# Altium PCB NB3000XN.PcbDoc (part 38 of 71)
Units mil, origin at the board's own origin, x right, y up, seen from the top; angles counter-clockwise.
Board outline 9527.56 x 6929.77 mil, 6 copper layers (Top Layer, GND+SHIELD, MidLayer1, MidLayer2, P2 - 3V3+5V0, Bottom Layer), stack 62.375 mil thick; 832 components, 1027 nets, 4655 pads, 4981 vias.
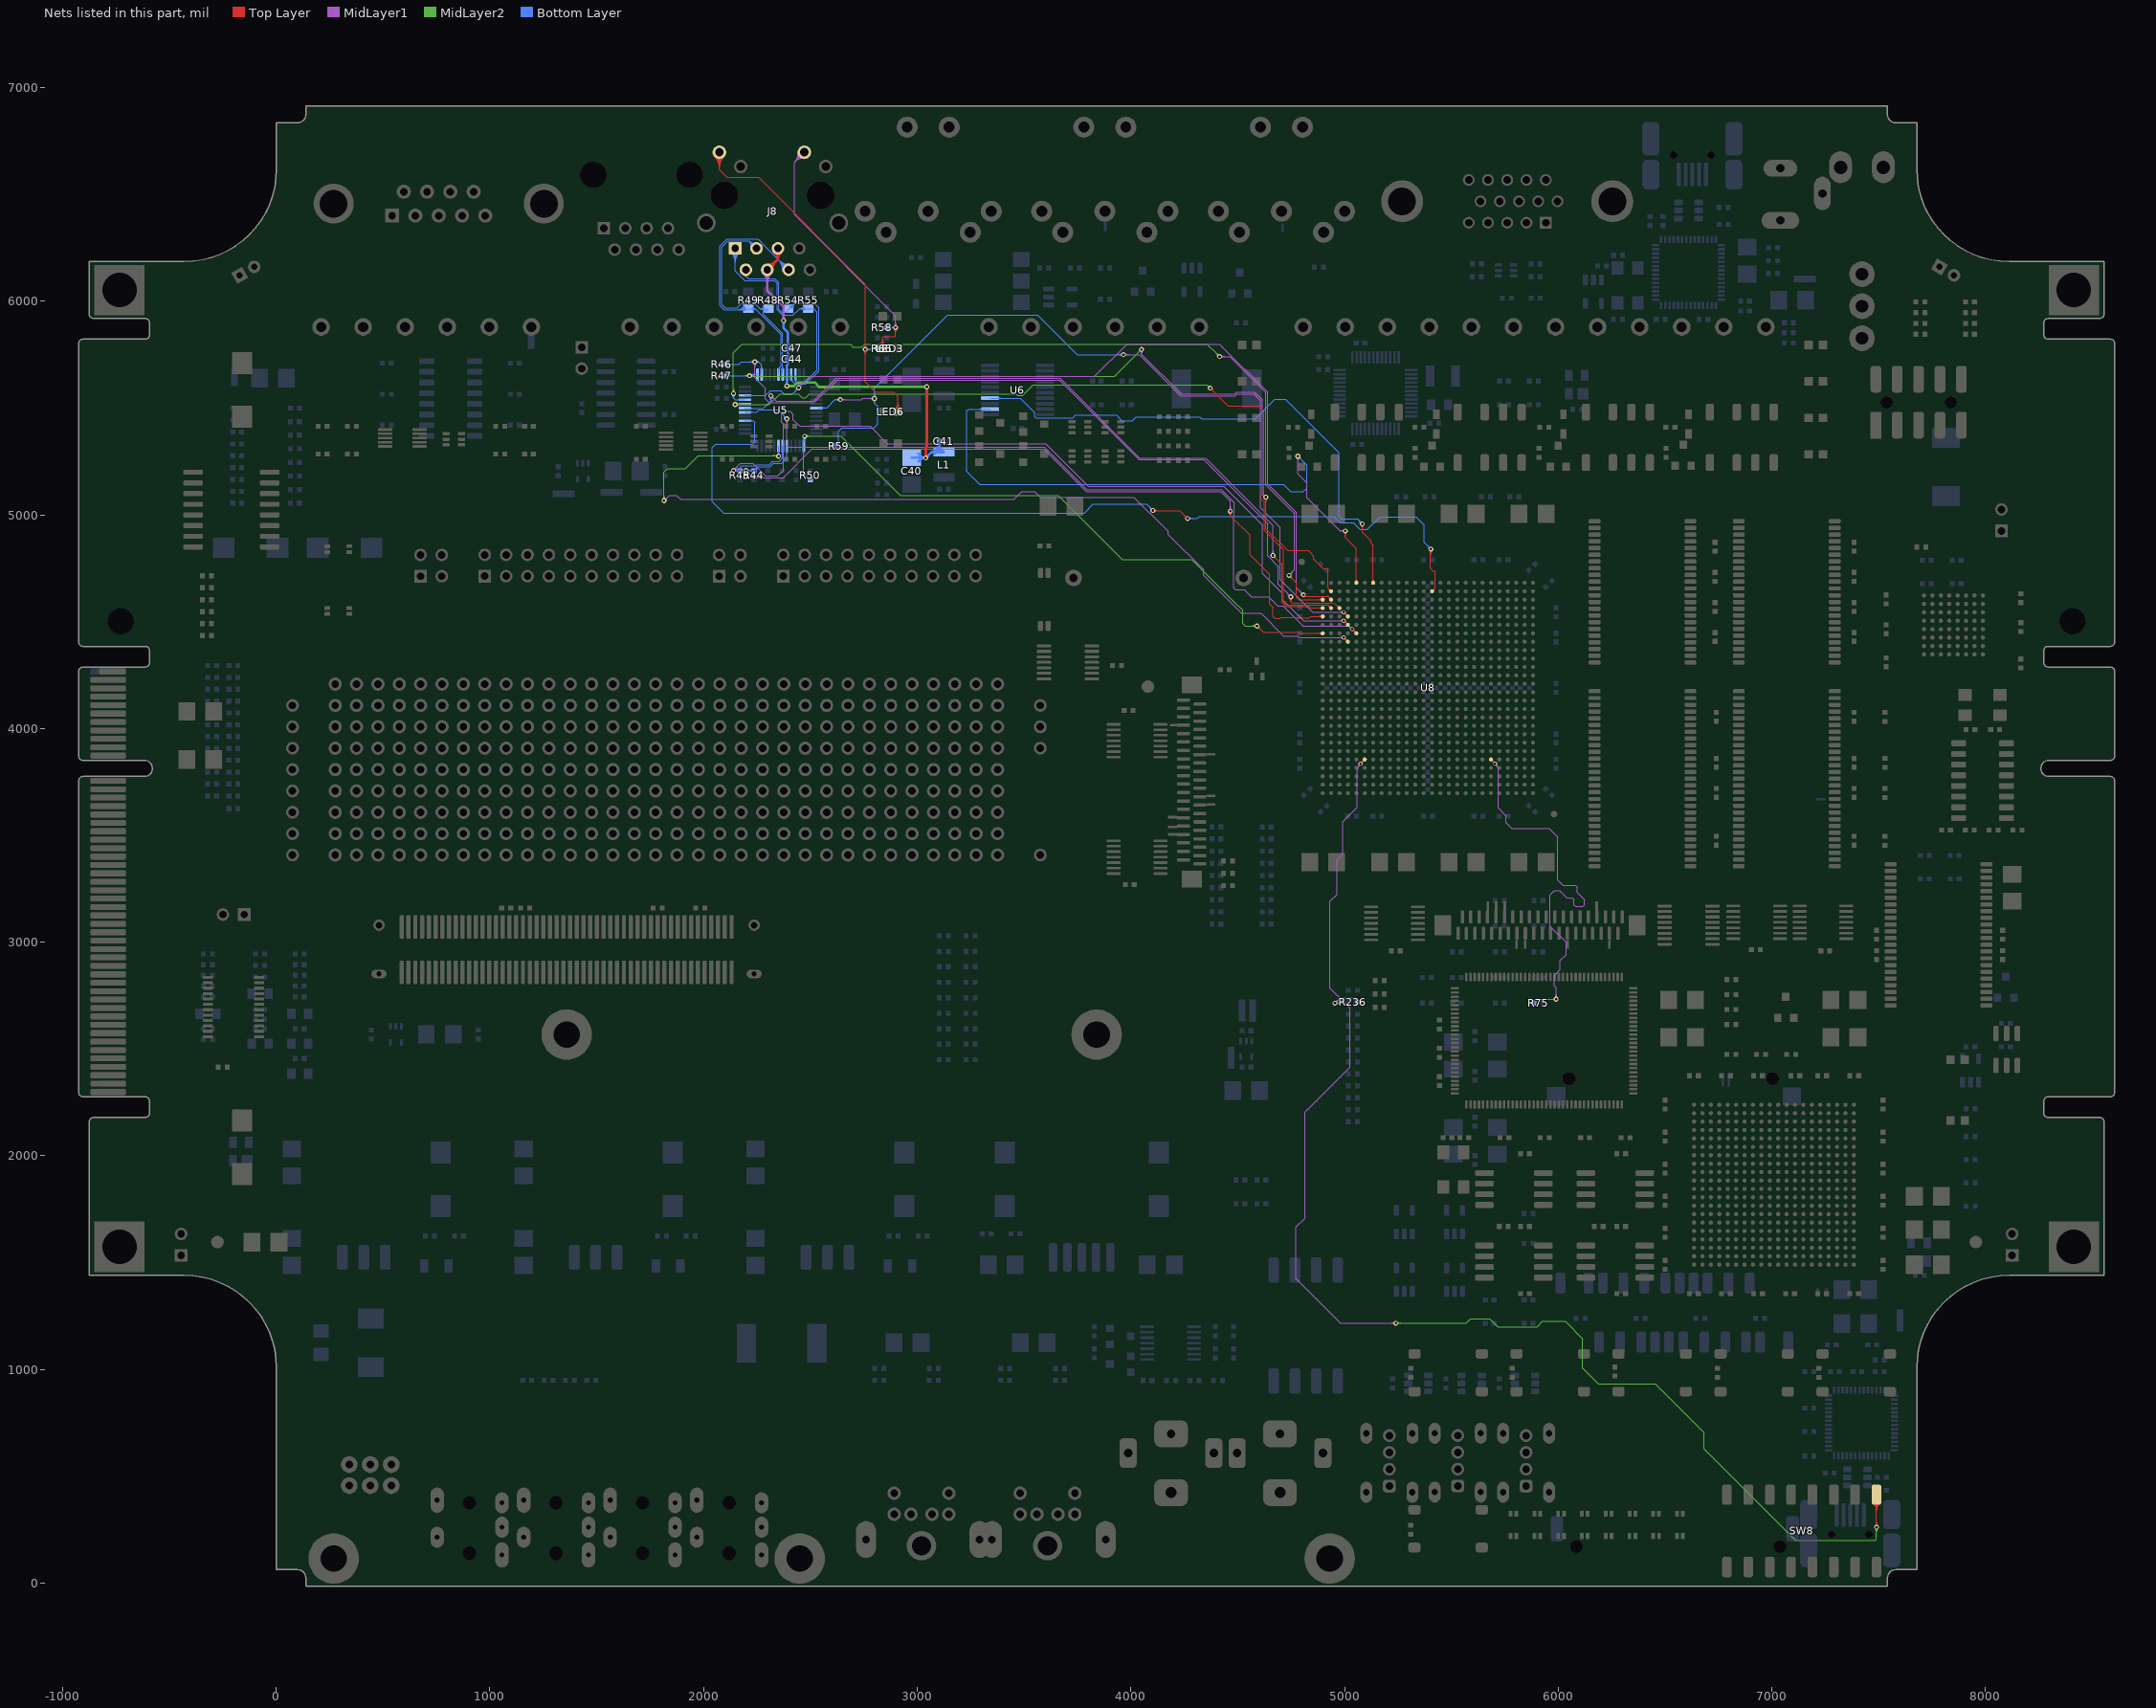
[diagram p42: the nets of this part, all layers, seen from the top]

## Via types
v1: diameter 23, hole 11.81, Top Layer to Bottom Layer, 3672 vias
v2: diameter 26, hole 11.81, Top Layer to Bottom Layer, 461 vias
v3: diameter 19, hole 11.81, Top Layer to Bottom Layer, tented both sides, 396 vias
v4: diameter 23.62, hole 11.81, Top Layer to Bottom Layer, 288 vias
v5: diameter 20, hole 11.81, Top Layer to Bottom Layer, 91 vias
v6: diameter 23, hole 11.81, Top Layer to Bottom Layer, tented both sides, 50 vias
v7: diameter 31, hole 11.81, Top Layer to Bottom Layer, 15 vias
v8: diameter 27.56, hole 11.81, Top Layer to Bottom Layer, tented both sides, 4 vias
v9: diameter 29, hole 11.81, Top Layer to Bottom Layer, 3 vias
v10: diameter 21, hole 11.81, Top Layer to Bottom Layer, 1 vias

## Nets (pads, with @x,y where several pads share a name; then routed paths per layer and width w, separated by ;. In a path a pad name is that pad's centre, name@x,y a point inside that pad or via, vN(x,y) a via of type N, cw(c..) or ccw(c..) an arc to the next point about the centre after c; other vN are vias at no path point) (continued)
DIPSW.D7: R236.1 SW8.9 U8.AB6 | length 7106.8
  Top Layer w4: v3(5075.04,3835.67) U8.AB6@5094.72,3855.35 ; U8.AB6@5087.22,3855.35 cw(c5069.12,3855.35) 5081.92,3842.55 cw(c5094.72,3829.75) U8.AB6@5094.72,3847.85 ; U8.AB6@5087.38,3855.35 cw(c5069.66,3855.35) 5082.19,3842.82 cw(c5094.72,3830.29) U8.AB6@5094.72,3848.01 ; SW8.9@7475.69,374.19 cw(c7441.13,339.63) 7490,339.63 cw(c7538.87,339.63) SW8.9@7504.31,374.19 ; SW8.9@7478.51,377.02 cw(c7450.78,349.29) 7490,349.29 cw(c7529.22,349.29) SW8.9@7501.49,377.02 ; SW8.9@7481.34,379.85 cw(c7460.44,358.94) 7490,358.94 cw(c7519.56,358.94) SW8.9@7498.66,379.85 ; v1@7483.47,268.43 ccw(c7467.71,284.18) 7490,284.18 ; v1@7486.3,265.6 ccw(c7477.37,274.53) 7490,274.53 ; 7490,275.44 ccw(c7503.93,275.44) v1@7494.08,265.6 ; 7490,285.1 ccw(c7513.58,285.1) v1@7496.91,268.43 ; SW8.9@7490,414.29 7490,273.23 7490.19,273.04 v1(7490.19,261.71) ; 5087.84,3848.47 cw(c5075.04,3861.28) 5075.04,3843.17 ccw(c5075.04,3861.28) 5087.84,3848.47 ; 5087.84,3848.47 ccw(c5100.65,3835.67) 5082.54,3835.67 cw(c5100.65,3835.67) 5087.84,3848.47
  MidLayer1 w4: v1(4955,2715) 5002.23,2715 ; v1@4958.89,2711.11 cw(c4968.28,2701.72) 4968.28,2715 cw(c4968.28,2728.28) v1@4958.89,2718.89 ; v1@4961.72,2708.28 cw(c4977.93,2692.06) 4977.93,2715 cw(c4977.93,2737.93) v1@4961.72,2721.72 ; 5064.62,3820.81 ccw(c5092.66,3803.16) 5059.53,3802.99 5059.53,3718.62 5059.53,3670 5059.53,3660 5059.53,3630.7 4992.19,3563.35 4992.19,3413.69 4964.86,3386.36 4964.86,3224.71 4931.86,3191.71 4931.86,2785.37 5002.23,2715 ; v3@5067.65,3834.37 cw(c5049.82,3831.22) 5064.65,3820.84 cw(c5079.49,3810.45) v3@5076.34,3828.28 ; v1@5233.47,1209.99 ccw(c5217.26,1193.77) 5217.26,1216.71 ccw(c5217.26,1239.64) v1@5233.47,1223.43 ; v1@5236.3,1212.82 ccw(c5226.91,1203.43) 5226.91,1216.71 ccw(c5226.91,1229.99) v1@5236.3,1220.6 ; v1(5240.19,1216.71) 4981.86,1216.71 4773.52,1425.04 4773.52,1666.71 4815.19,1708.37 4815.19,2204.71 5025.52,2415.04 5025.52,2691.71 5002.23,2715
  MidLayer2 w4: v1(5240.19,1216.71) 5570.14,1216.71 5590.72,1237.29 5680.32,1237.29 5717.39,1200.21 5901.32,1200.21 5926.31,1225.21 6032.42,1225.21 6113.36,1144.27 6113.36,1007.23 6187.7,932.88 6193.46,932.88 6193.96,933.37 6370,933.37 ; v1@5244.08,1212.82 cw(c5253.47,1203.43) 5253.47,1216.71 cw(c5253.47,1229.99) v1@5244.08,1220.6 ; v1@5246.91,1209.99 cw(c5263.13,1193.77) 5263.13,1216.71 cw(c5263.13,1239.64) v1@5246.91,1223.43 ; 6370,933.71 6454.98,933.71 6683.77,704.91 6683.77,627.79 7111.52,200.04 7485.04,200.04 7490.19,205.19 v1(7490.19,261.71) ; v1@7484,254.5 cw(c7472.46,241.04) 7490.19,241.04 cw(c7507.92,241.04) v1@7496.38,254.5 ; v1@7486.61,257.53 cw(c7479.93,249.74) 7490.19,249.74 cw(c7500.45,249.74) v1@7493.77,257.53
  Bottom Layer w4: v1(4955,2715) 4980,2740 5040.27,2740 R236.1@5061.18,2719.09 ; v1@4955,2720.5 ccw(c4955,2733.78) 4964.39,2724.39 ccw(c4973.78,2715) v1@4960.5,2715 ; v1@4955,2724.5 ccw(c4955,2747.43) 4971.22,2731.22 ccw(c4987.43,2715) v1@4964.5,2715 ; 5044.43,2735.84 ccw(c5061.18,2752.59) R236.1@5061.18,2728.9 ; 5045.62,2734.65 cw(c5030.55,2719.58) R236.1@5051.86,2719.58 ; R236.1@5051.26,2729.01 ccw(c5061.18,2738.93) R236.1@5061.18,2724.9 ; R236.1@5052.45,2727.82 cw(c5044.21,2719.58) R236.1@5055.86,2719.58
DONE: R75.2 U8.AB21 | length 2109.8
  Top Layer w4: U8.AB21@5685.28,3847.85 cw(c5685.28,3829.75) 5698.08,3842.55 cw(c5710.88,3855.35) U8.AB21@5692.78,3855.35 ; U8.AB21@5685.28,3848.01 cw(c5685.28,3830.29) 5697.81,3842.82 cw(c5710.34,3855.35) U8.AB21@5692.62,3855.35 ; U8.AB21@5685.28,3855.35 v3(5704.96,3835.67) ; 5692.16,3848.47 cw(c5679.35,3835.67) 5697.46,3835.67 ccw(c5679.35,3835.67) 5692.16,3848.47 ; 5692.16,3848.47 ccw(c5704.96,3861.28) 5704.96,3843.17 cw(c5704.96,3861.28) 5692.16,3848.47
  MidLayer1 w4: v3@5703.66,3828.28 cw(c5700.51,3810.45) 5715.35,3820.84 cw(c5730.18,3831.22) v3@5712.35,3834.37 ; 5715.38,3820.81 cw(c5687.34,3803.16) 5720.47,3802.99 5720.47,3718.62 5720.47,3670 5720.47,3660 5720.47,3628.06 5756.52,3592 5756.52,3559.98 5783.13,3533.37 5956.86,3533.37 5998.52,3491.71 5998.52,3291.29 6023.1,3266.71 6080.86,3266.71 6089.19,3258.37 6089.19,3233.37 6123.52,3199.04 6123.52,3175.04 6115.19,3166.71 6081.86,3166.71 6073.52,3175.04 6073.52,3200.04 6065.19,3208.37 6040.19,3208.37 6006.86,3241.71 5981.86,3241.71 5962.52,3222.37 5962.52,3074.73 6037.81,2999.44 6037.81,2942.31 6009.19,2913.69 6009.19,2871.37 5981.86,2844.04 5981.86,2795 5990.19,2786.67 v1(5990.19,2733.37) ; v1@5983.47,2740.09 ccw(c5967.26,2756.31) 5990.19,2756.31 ccw(c6013.13,2756.31) v1@5996.91,2740.09 ; v1@5986.3,2737.26 ccw(c5976.91,2746.65) 5990.19,2746.65 ccw(c6003.47,2746.65) v1@5994.08,2737.26
  Bottom Layer w4: R75.2@5885.82,2716.71 R75.2@5885.82,2715 5904.19,2733.37 v1(5990.19,2733.37) ; R75.2@5885.82,2720.81 ccw(c5885.82,2734.84) R75.2@5895.74,2724.92 ; R75.2@5885.82,2724.81 ccw(c5885.82,2748.5) 5902.57,2731.75 ; R75.2@5891.14,2715.49 cw(c5902.79,2715.49) R75.2@5894.55,2723.73 ; R75.2@5895.14,2715.49 cw(c5916.45,2715.49) 5901.38,2730.56
ETH#.ACT_A: J8.9 LED6.1 R66.2 | length 2525.6
  Top Layer w4: J8.9@2052.85,6676.36 cw(c2001.82,6625.33) 2073.98,6625.33 cw(c2146.14,6625.33) J8.9@2095.12,6676.36 ; J8.9@2055.68,6679.18 cw(c2011.48,6634.99) 2073.98,6634.99 cw(c2136.49,6634.99) J8.9@2092.29,6679.18 ; J8.9@2058.51,6682.01 cw(c2021.14,6644.64) 2073.98,6644.64 cw(c2126.83,6644.64) J8.9@2089.46,6682.01 ; J8.9@2061.33,6684.84 cw(c2030.79,6654.3) 2073.98,6654.3 cw(c2117.17,6654.3) J8.9@2086.63,6684.84 ; J8.9@2064.16,6687.67 cw(c2040.45,6663.96) 2073.98,6663.96 cw(c2107.52,6663.96) J8.9@2083.81,6687.67 ; J8.9@2073.98,6697.49 2073.98,6616.02 2110,6580 2256.9,6580 2756.86,6080.04 v1(2756.86,5775.04) 2756.86,5623.14 2805,5575 2890,5575 2909.01,5555.99 2909.01,5509.15 ; v1@2750.14,5768.32 cw(c2733.92,5752.11) 2756.86,5752.11 cw(c2779.79,5752.11) v1@2763.57,5768.32 ; v1@2750.14,5781.76 ccw(c2733.92,5797.98) 2756.86,5797.98 ccw(c2779.79,5797.98) v1@2763.57,5781.76 ; v1@2752.97,5771.15 cw(c2743.58,5761.76) 2756.86,5761.76 cw(c2770.14,5761.76) v1@2760.75,5771.15 ; v1@2752.97,5778.93 ccw(c2743.58,5788.32) 2756.86,5788.32 ccw(c2770.14,5788.32) v1@2760.75,5778.93 ; LED6.1@2896.51,5495.97 ccw(c2866.32,5526.16) 2909.01,5526.16 ccw(c2951.71,5526.16) LED6.1@2921.52,5495.97 ; LED6.1@2899.34,5493.15 ccw(c2875.97,5516.51) 2909.01,5516.51 ccw(c2942.05,5516.51) LED6.1@2918.69,5493.15 ; LED6.1@2902.16,5490.32 ccw(c2885.63,5506.85) 2909.01,5506.85 ccw(c2932.39,5506.85) LED6.1@2915.86,5490.32
  Bottom Layer w4: v1(2756.86,5775.04) 2779.86,5775.04 2783.82,5779 R66.2@2813.82,5779 ; v1@2760.75,5771.15 cw(c2770.14,5761.76) 2770.14,5775.04 cw(c2770.14,5788.32) v1@2760.75,5778.93 ; v1@2763.57,5768.32 cw(c2779.79,5752.11) 2779.79,5775.04 cw(c2779.79,5797.98) v1@2763.57,5781.76 ; R66.2@2807.23,5772.41 ccw(c2791.32,5756.5) 2791.32,5779 ccw(c2791.32,5801.5) R66.2@2807.23,5785.59 ; R66.2@2810.06,5775.24 ccw(c2800.98,5766.16) 2800.98,5779 ccw(c2800.98,5791.84) R66.2@2810.06,5782.76
ETH#.LINK_K: J8.11 LED3.2 R58.2 | length 1895
  Top Layer w4: LED3.2@2825.56,5792.51 ccw(c2795.37,5822.7) 2838.07,5822.7 ccw(c2880.77,5822.7) LED3.2@2850.58,5792.51 ; LED3.2@2828.39,5789.68 ccw(c2805.03,5813.04) 2838.07,5813.04 ccw(c2871.11,5813.04) LED3.2@2847.75,5789.68 ; LED3.2@2831.22,5786.85 ccw(c2814.69,5803.38) 2838.07,5803.38 ccw(c2861.45,5803.38) LED3.2@2844.92,5786.85 ; LED3.2@2838.07,5780 2838.07,5830.03 2843.04,5835 2896.57,5835 2898.86,5837.29 v1(2898.86,5876.71) ; v1@2892.14,5869.99 cw(c2875.92,5853.77) 2898.86,5853.77 cw(c2921.79,5853.77) v1@2905.57,5869.99 ; v1@2894.97,5872.82 cw(c2885.58,5863.43) 2898.86,5863.43 cw(c2912.14,5863.43) v1@2902.75,5872.82
  MidLayer1 w4: J8.11@2442.18,6695.71 cw(c2383.28,6692.2) 2425,6650.48 ; J8.11@2446.17,6695.95 cw(c2395.16,6692.91) 2431.29,6656.77 cw(c2467.43,6620.63) J8.11@2470.47,6671.65 ; J8.11@2450.16,6696.19 cw(c2407.03,6693.62) 2437.59,6663.06 cw(c2468.14,6632.51) J8.11@2470.71,6675.64 ; J8.11@2454.16,6696.43 cw(c2418.91,6694.32) 2443.88,6669.35 cw(c2468.85,6644.38) J8.11@2470.95,6679.63 ; J8.11@2470.24,6667.65 ccw(c2466.72,6608.76) 2425,6650.48 ; J8.11@2472.02,6697.49 2425,6650.48 ; v1@2892.14,5883.43 ccw(c2875.92,5899.64) 2898.86,5899.64 ccw(c2921.79,5899.64) v1@2905.57,5883.43 ; v1@2894.97,5880.6 ccw(c2885.58,5889.99) 2898.86,5889.99 ccw(c2912.14,5889.99) v1@2902.75,5880.6 ; v1(2898.86,5876.71) 2898.86,5931.14 2425,6405 2425,6650.48
  Bottom Layer w4: R58.2@2856.18,5877 2882.57,5877 2882.86,5876.71 ; R58.2@2859.94,5873.24 cw(c2869.02,5864.16) 2869.02,5877 cw(c2869.02,5889.84) R58.2@2859.94,5880.76 ; R58.2@2862.77,5870.41 cw(c2878.68,5854.5) 2878.68,5877 cw(c2878.68,5899.5) R58.2@2862.77,5883.59 ; v1@2890.52,5872.16 ccw(c2882.86,5867.98) 2882.86,5876.71 ; v1@2890.52,5881.26 cw(c2882.86,5885.43) 2882.86,5876.71 ; v1(2898.86,5876.71) 2882.86,5876.71
ETH#.RX_CT: C40.1 C41.2 C44.1 C47.2 J8.4 J8.5 L1.1 U5.32 | length 2667.9
  Top Layer w12: J8.4@2298,6147.49 2348,6197.49 ; J8.4@2298,6171.02 ccw(c2298,6227.82) 2338.16,6187.66 ccw(c2378.33,6147.49) J8.4@2321.53,6147.49 ; J8.5@2333,6229.36 cw(c2306.64,6197.49) 2348,6197.49 ; J8.5@2348,6247.49 2348,6197.49 ; J8.5@2363,6229.36 ccw(c2389.36,6197.49) 2348,6197.49 ; v1@3036.3,5270.6 ccw(c3026.91,5279.99) 3040.19,5279.99 ccw(c3053.47,5279.99) v1@3044.08,5270.6 ; v1(3040.19,5266.71) 3040.19,5315.19 3045,5320 v4(3045,5600) ; v4@3040.89,5595.89 cw(c3030.97,5585.97) 3045,5585.97 cw(c3059.03,5585.97) v4@3049.11,5595.89
  MidLayer1 w12: J8.4@2281.36,6130.85 cw(c2241.2,6090.69) 2298,6090.69 cw(c2354.8,6090.69) J8.4@2314.64,6130.85 ; J8.4@2298,6147.49 2298,6051.28 2375,5974.28 v4(2375,5910) ; v4@2370.89,5914.11 ccw(c2360.97,5924.03) 2375,5924.03 ccw(c2389.03,5924.03) v4@2379.11,5914.11
  MidLayer2 w12: v1(2390.19,5603.37) 2422.97,5603.37 2436.09,5616.5 2436.5,5616.5 2440,5620 2520,5620 2541.81,5598.19 2603.19,5598.19 2605,5600 v4(3045,5600) ; v1@2394.08,5599.49 cw(c2403.47,5590.1) 2403.47,5603.37 cw(c2403.47,5616.65) v1@2394.08,5607.26 ; v4@3040.89,5595.89 ccw(c3030.97,5585.97) 3030.97,5600 ccw(c3030.97,5614.03) v4@3040.89,5604.11
  Bottom Layer w12: v4@2370.89,5905.89 cw(c2360.97,5895.97) 2375,5895.97 cw(c2389.03,5895.97) v4@2379.11,5905.89 ; v4(2375,5910) 2375,5875 2394.33,5855.67 C47.2@2394.33,5780 C44.1@2394.33,5730 ; v1@2386.3,5607.26 ccw(c2376.42,5617.14) 2390.39,5617.14 ; v1(2390.19,5603.37) 2390.39,5603.58 U5.32@2390.39,5657.32 2390.39,5701.06 2394.33,5705 C44.1@2394.33,5730 ; C44.1@2390.22,5725.89 cw(c2380.3,5715.97) 2394.33,5715.97 cw(c2408.36,5715.97) C44.1@2398.44,5725.89 ; C44.1@2390.22,5734.11 ccw(c2380.3,5744.03) 2394.33,5744.03 ccw(c2408.36,5744.03) C44.1@2398.44,5734.11 ; C47.2@2390.22,5775.89 cw(c2380.3,5765.97) 2394.33,5765.97 cw(c2408.36,5765.97) C47.2@2398.44,5775.89 ; C47.2@2390.22,5784.11 ccw(c2380.3,5794.03) 2394.33,5794.03 ccw(c2408.36,5794.03) C47.2@2398.44,5784.11 ; 2390.39,5616.16 ccw(c2402.98,5616.16) v1@2394.08,5607.26 ; C40.1@2975,5267.99 v1@3038.91,5267.99 ; C40.1@3007.29,5250.4 cw(c3038.9,5230.8) v1@3038.9,5267.99 ; C40.1@3007.29,5285.58 ccw(c3038.9,5305.19) v1@3038.9,5267.99 ; 3023.81,5267.99 cw(c3023.81,5250.33) v1@3036.3,5262.82 ; v1@3040.19,5272.21 ccw(c3040.19,5285.49) 3049.58,5276.1 ccw(c3058.97,5266.71) v1@3045.69,5266.71 ; L1.1@3084.66,5285.67 ccw(c3067.54,5272.39) 3067.54,5294.06 ; L1.1@3084.66,5302.44 cw(c3067.54,5315.72) 3067.54,5294.06 ; L1.1@3086.6,5304.47 ccw(c3052.64,5344.33) C41.2@3105,5344.33 ; L1.1@3094.38,5295.34 ccw(c3074.78,5318.34) 3105,5318.34 ; C41.2@3100.22,5340.89 cw(c3088.69,5329.36) 3105,5329.36 ; C41.2@3104.33,5345 C41.2@3105,5344.33 ; 3105,5332.59 cw(c3116.74,5332.59) C41.2@3108.44,5340.89 ; v1@3038.91,5267.99 v1(3040.19,5266.71) 3067.54,5294.05 ; 3067.54,5294.06 L1.1@3125,5294.06 3105,5314.06 C41.2@3105,5344.33
ETH#.RX_N: J8.6 R49.1 U5.30 | length 1788
  Bottom Layer w4: 2148.79,5960 ccw(c2148.79,6021.92) R49.1@2192.57,5978.14 ; 2158.45,5960 ccw(c2158.45,6012.26) R49.1@2195.4,5975.31 ; 2168.11,5960 ccw(c2168.11,6002.6) R49.1@2198.23,5972.48 ; 2175.98,5960 cw(c2175.98,5936.53) R49.1@2192.57,5953.12 ; 2177.76,5960 ccw(c2177.76,5992.95) R49.1@2201.06,5969.65 ; R49.1@2185.63,5960 cw(c2185.63,5946.18) R49.1@2195.4,5955.95 ; R49.1@2206.12,5960 2097,5960 2077,5980 2077,6257 2111.02,6291.02 2254.72,6291.02 2283.53,6262.21 2283.53,6261.72 2397.76,6147.49 J8.6@2398,6147.49 ; R49.1@2211.75,5963.88 2243.11,5963.88 ; R49.1@2226.65,5958.57 cw(c2236.04,5952.93) 2236.04,5963.88 ; R49.1@2227.71,5970.5 ccw(c2237.31,5974.15) 2237.31,5963.88 ; R49.1@2230.07,5956.51 cw(c2243.11,5948.67) 2243.11,5963.88 ; R49.1@2231.45,5971.92 ccw(c2243.11,5976.36) 2243.11,5963.88 ; 2350.59,6194.66 ccw(c2398,6242.06) J8.6@2398,6175.02 ; U5.30@2351.02,5657.32 2351.02,5686.02 2362.71,5697.71 2362.71,5844.28 2243.11,5963.88 ; U5.30@2351.02,5680.85 cw(c2363.51,5680.85) 2354.68,5689.68 ; 2351.18,6194.07 cw(c2304.6,6147.49) J8.6@2370.47,6147.49 ; U5.30@2355.02,5680.85 cw(c2377.17,5680.85) 2361.51,5696.51 ; 2357.42,6187.83 ccw(c2398,6228.41) J8.6@2398,6171.02 ; 2358.01,6187.24 cw(c2318.26,6147.49) J8.6@2374.47,6147.49 ; 2364.25,6181 ccw(c2398,6214.75) J8.6@2398,6167.02 ; 2364.84,6180.41 cw(c2331.92,6147.49) J8.6@2378.47,6147.49 ; 2371.08,6174.17 ccw(c2398,6201.09) J8.6@2398,6163.02 ; 2371.67,6173.58 cw(c2345.57,6147.49) J8.6@2382.47,6147.49
ETH#.RX_P: J8.3 R48.1 U5.31 | length 1321.8
  Bottom Layer w4: J8.3@2221.12,6253.42 ccw(c2189.79,6260.33) 2212.47,6283.02 ; J8.3@2225.02,6252.56 ccw(c2198.25,6258.46) 2217.64,6277.85 ccw(c2237.03,6297.25) J8.3@2242.93,6270.47 ; J8.3@2228.93,6251.7 ccw(c2206.7,6256.6) 2222.8,6272.69 ccw(c2238.89,6288.79) J8.3@2243.79,6266.56 ; J8.3@2242.07,6274.37 cw(c2235.16,6305.7) 2212.47,6283.02 ; J8.3@2248,6247.49 2212.47,6283.02 ; R48.1@2283.75,5955.7 ccw(c2265,5942.96) 2265,5965.63 ; R48.1@2283.75,5975.56 cw(c2265,5988.3) 2265,5965.63 ; R48.1@2287.06,5957.94 ccw(c2272.55,5948.09) 2272.55,5965.63 ccw(c2272.55,5983.17) R48.1@2287.06,5973.32 ; U5.31@2367.88,5683.68 ccw(c2361.05,5690.51) 2370.71,5690.51 ccw(c2380.37,5690.51) U5.31@2373.54,5683.68 ; U5.31@2370.71,5657.32 2370.71,5847.6 2280,5938.31 2280,5950 2287.68,5950 R48.1@2303.31,5965.63 2265,5965.63 ; 2212.47,6283.02 2114.33,6283.02 2085,6253.69 2085,5985 2100,5970 2157.79,5970 2180,5992.21 2238.42,5992.21 2265,5965.63
ETH#.TX_N: J8.2 R54.2 U5.33 | length 1158.1
  Bottom Layer w4: J8.2@2198,6147.49 2198,6117 2210,6105 2335,6105 2353,6087 2353,5963.31 2366.31,5950 2385.94,5950 2399.13,5963.19 2427.25,5991.31 ; R54.2@2402.77,5975.25 ccw(c2404.64,5990.67) R54.2@2415.62,5979.68 ; R54.2@2403.25,5979.22 ccw(c2405.89,6001.05) 2421.44,5985.5 ; R54.2@2403.73,5983.19 ccw(c2407.14,6011.43) 2427.25,5991.31 ; U5.33@2410.08,5629.8 cw(c2410.08,5625.09) U5.33@2413.41,5628.42 ; U5.33@2410.08,5657.32 2410.08,5631.74 2428.94,5612.88 2478.26,5612.88 2540,5674.62 2540,5968.41 2517.09,5991.31 2427.25,5991.31 ; R54.2@2411.23,5966.82 cw(c2426.67,5968.72) R54.2@2415.67,5979.73 ; U5.33@2414.08,5633.8 ccw(c2428.69,5633.8) 2418.36,5623.47 ; R54.2@2415.2,5967.31 cw(c2436.98,5970) 2421.46,5985.52 ; R54.2@2419.17,5967.8 cw(c2447.3,5971.27) 2427.25,5991.31
ETH#.TX_P: J8.1 R55.2 U5.34 | length 1538.5
  Bottom Layer w4: J8.1@2128.54,6228.03 cw(c2081.54,6181.03) 2148,6181.03 cw(c2214.46,6181.03) J8.1@2167.46,6228.03 ; J8.1@2131.36,6230.85 cw(c2091.2,6190.69) 2148,6190.69 cw(c2204.8,6190.69) J8.1@2164.64,6230.85 ; J8.1@2134.19,6233.68 cw(c2100.86,6200.35) 2148,6200.35 cw(c2195.14,6200.35) J8.1@2161.81,6233.68 ; J8.1@2137.02,6236.51 cw(c2110.51,6210) 2148,6210 cw(c2185.49,6210) J8.1@2158.98,6236.51 ; J8.1@2148.24,6247.49 J8.1@2148,6247.49 2148,6142 2193,6097 2331.69,6097 2345,6083.69 2345,5960 2370,5935 2420,5935 2450.63,5965.63 ; U5.34@2426.94,5630.97 cw(c2420.11,5624.14) 2429.76,5624.14 cw(c2439.42,5624.14) U5.34@2432.59,5630.97 ; U5.34@2429.76,5657.32 2429.76,5623.37 2431.43,5621.71 2432.26,5620.88 2474.95,5620.88 2531.86,5677.79 2531.86,5950.04 2516.27,5965.63 ; R55.2@2470.71,5955.32 ccw(c2450.63,5940.92) 2450.63,5965.63 ; R55.2@2470.71,5975.94 cw(c2450.63,5990.33) 2450.63,5965.63 ; R55.2@2473.96,5957.65 ccw(c2458.42,5946.51) 2458.42,5965.63 ccw(c2458.42,5984.75) R55.2@2473.96,5973.61 ; R55.2@2488.13,5967.5 R55.2@2490,5965.63 ; R55.2@2512.3,5962.34 cw(c2516.27,5961.59) 2516.27,5965.63 ; R55.2@2512.3,5968.92 ccw(c2516.27,5969.67) 2516.27,5965.63 ; 2450.63,5965.63 R55.2@2490,5965.63 ; R55.2@2490,5965.63 2516.27,5965.63
ETH.E_COL: R50.1 U5.1 U8.G1 | length 3475.1
  Top Layer w4: v1@4590,4470.5 cw(c4590,4447.56) 4606.22,4463.78 cw(c4622.43,4480) v1@4599.5,4480 ; v1@4590,4474.5 cw(c4590,4461.22) 4599.39,4470.61 cw(c4608.78,4480) v1@4595.5,4480 ; v1(4590,4480) 4620.13,4449.87 4780.64,4449.87 4784.6,4445.91 4860,4445.91 4870,4445.91 U8.G1@4897.87,4445.91 ; U8.G1@4892.57,4440.6 ccw(c4879.77,4427.8) 4879.77,4445.91 ccw(c4879.77,4464.01) U8.G1@4892.57,4451.21 ; 4880.15,4445.91 ccw(c4880.15,4463.63) 4892.68,4451.1 cw(c4880.15,4463.63) 4880.15,4445.91 ; 4880.15,4445.91 cw(c4880.15,4428.18) 4892.68,4440.71 ccw(c4880.15,4428.18) 4880.15,4445.91
  MidLayer2 w4: v1(2473.52,5368.37) 2643.88,5368.37 2920.54,5091.71 3659.84,5091.71 3960.17,4791.37 4285.17,4791.37 4479.62,4596.92 4523.19,4553.35 4523.19,4491.81 4535,4480 v1(4590,4480) ; v1@2477.41,5364.49 cw(c2486.8,5355.1) 2486.8,5368.37 cw(c2486.8,5381.65) v1@2477.41,5372.26 ; v1@2480.24,5361.66 cw(c2496.46,5345.44) 2496.46,5368.37 cw(c2496.46,5391.31) v1@2480.24,5375.09 ; v1@4583.28,4473.28 ccw(c4567.06,4457.06) 4567.06,4480 ccw(c4567.06,4502.93) v1@4583.28,4486.72 ; v1@4586.11,4476.11 ccw(c4576.72,4466.72) 4576.72,4480 ccw(c4576.72,4493.28) v1@4586.11,4483.89
  Bottom Layer w4: U5.1@2466.31,5296.32 cw(c2459.48,5289.49) 2469.13,5289.49 cw(c2478.79,5289.49) U5.1@2471.96,5296.32 ; U5.1@2466.31,5349.03 ccw(c2448.88,5366.46) v1@2473.52,5366.46 ; v1@2466.81,5361.66 cw(c2450.59,5345.44) 2473.52,5345.44 cw(c2496.46,5345.44) v1@2480.24,5361.66 ; U5.1@2469.13,5346.2 ccw(c2458.53,5356.8) 2473.52,5356.8 ; v1@2469.64,5364.49 cw(c2460.25,5355.1) 2473.52,5355.1 cw(c2486.8,5355.1) v1@2477.41,5364.49 ; v1(2473.52,5368.37) 2473.52,5345 2469.13,5340.61 U5.1@2469.13,5322.68 2469.13,5194.69 R50.1@2500,5163.82 ; 2483.25,5180.57 cw(c2466.5,5163.82) R50.1@2490.19,5163.82 ; 2484.44,5179.38 ccw(c2499.51,5194.45) R50.1@2499.51,5173.14 ; R50.1@2490.08,5173.74 cw(c2480.16,5163.82) R50.1@2494.19,5163.82 ; R50.1@2491.27,5172.55 ccw(c2499.51,5180.79) R50.1@2499.51,5169.14
ETH.E_CRS: U6.12 U8.A5 | length 3232.6
  Top Layer w4: v1@4997.14,4918.32 cw(c4980.92,4902.11) 5003.86,4902.11 cw(c5026.79,4902.11) v1@5010.57,4918.32 ; v1@4999.97,4921.15 cw(c4990.58,4911.76) 5003.86,4911.76 cw(c5017.14,4911.76) v1@5007.75,4921.15 ; v1(5003.86,4925.04) 5003.86,4893.67 5030.15,4867.37 5055.35,4842.17 5055.35,4720 5055.35,4710 U8.A5@5055.35,4682.13 ; U8.A5@5050.05,4687.43 ccw(c5037.25,4700.23) 5055.35,4700.23 ccw(c5073.46,4700.23) U8.A5@5060.66,4687.43 ; U8.A5@5050.16,4687.32 ccw(c5037.63,4699.85) 5055.35,4699.85 ccw(c5073.08,4699.85) U8.A5@5060.55,4687.32
  MidLayer1 w4: v1@4775.14,5268.32 cw(c4758.92,5252.11) 4781.86,5252.11 cw(c4804.79,5252.11) v1@4788.57,5268.32 ; v1@4777.97,5271.15 cw(c4768.58,5261.76) 4781.86,5261.76 cw(c4795.14,5261.76) v1@4785.75,5271.15 ; v1(4781.86,5275.04) 4781.86,5191.71 4823.52,5150.04 4823.52,5080.37 4978.86,4925.04 v1(5003.86,4925.04) ; v1@4997.14,4918.32 ccw(c4980.92,4902.11) 4980.92,4925.04 ccw(c4980.92,4947.98) v1@4997.14,4931.76 ; v1@4999.97,4921.15 ccw(c4990.58,4911.76) 4990.58,4925.04 ccw(c4990.58,4938.32) v1@4999.97,4928.93
  Bottom Layer w4: U6.12@3302.75,5490.58 ccw(c3291.04,5478.88) 3291.04,5495.43 ccw(c3291.04,5511.99) U6.12@3302.75,5500.28 ; U6.12@3341.06,5495.43 3239.86,5495.43 3231.86,5487.43 3231.86,5203.14 3292.81,5142.19 4714.71,5142.19 4748.52,5108.37 4806.86,5108.37 4823.52,5125.04 4823.52,5233.37 v1(4781.86,5275.04) ; v1@4781.86,5265.54 cw(c4781.86,5242.61) 4798.07,5258.82 cw(c4814.29,5275.04) v1@4791.36,5275.04 ; v1@4781.86,5269.54 cw(c4781.86,5256.26) 4791.25,5265.65 cw(c4800.64,5275.04) v1@4787.36,5275.04
ETH.E_MDC: R47.1 U5.25 U8.B2 | length 4345.9
  Top Layer w4: v1@4625.14,5076.66 cw(c4608.92,5060.44) 4631.86,5060.44 cw(c4654.79,5060.44) v1@4638.57,5076.66 ; v1@4627.97,5079.49 cw(c4618.58,5070.1) 4631.86,5070.1 cw(c4645.14,5070.1) v1@4635.75,5079.49 ; v1(4631.86,5083.37) 4631.86,4935.04 4733.52,4833.37 4830.19,4833.37 4855.52,4808.04 4855.52,4794.41 4892.25,4757.69 4900.94,4749 4919,4749 4921.74,4746.26 4921.74,4728.2 4921.74,4724.74 4921.74,4720 4921.74,4710 4921.74,4662.47 ; 4921.74,4662.47 ccw(c4931.89,4662.47) 4924.71,4655.29 ; 4921.74,4662.47 ccw(c4931.89,4662.47) 4924.71,4655.29 ; 4924.71,4655.29 ccw(c4937.24,4667.83) 4937.24,4650.1 cw(c4937.24,4667.83) 4924.71,4655.29 ; 4924.71,4655.29 cw(c4912.17,4642.76) 4929.9,4642.76 ccw(c4912.17,4642.76) 4924.71,4655.29
  MidLayer1 w4: v1@4043.14,5768.32 cw(c4026.92,5752.11) 4049.86,5752.11 cw(c4072.79,5752.11) v1@4056.57,5768.32 ; v1@4045.97,5771.15 cw(c4036.58,5761.76) 4049.86,5761.76 cw(c4063.14,5761.76) v1@4053.75,5771.15 ; v1(4049.86,5775.04) 4049.86,5751.69 4236.55,5565 4485,5565 4495,5575 4578.69,5575 4615.19,5538.5 4615.19,5100.04 v1(4631.86,5083.37) ; v1@4622.36,5083.37 ccw(c4599.42,5083.37) 4615.64,5099.59 ccw(c4631.86,5115.81) v1@4631.86,5092.87 ; v1@4626.36,5083.37 ccw(c4613.08,5083.37) 4622.47,5092.76 ccw(c4631.86,5102.15) v1@4631.86,5088.87
  MidLayer2 w4: v1(2215.19,5651.67) 2216.82,5650.04 3924.86,5650.04 v1(4049.86,5775.04) ; v1@2219.08,5655.56 ccw(c2232.39,5668.87) 2232.39,5650.04 ; v1@2221.91,5644.95 cw(c2234.2,5632.66) 2234.2,5650.04 ; v1@2221.91,5658.38 ccw(c2242.05,5678.53) 2242.05,5650.04 ; v1@4040.36,5775.04 cw(c4017.42,5775.04) 4033.64,5758.82 cw(c4049.86,5742.61) v1@4049.86,5765.54 ; v1@4044.36,5775.04 cw(c4031.08,5775.04) 4040.47,5765.65 cw(c4049.86,5756.26) v1@4049.86,5769.54
  Bottom Layer w4: R47.1@2106.18,5651.67 v1(2215.19,5651.67) 2215.19,5651.99 2220.52,5657.32 U5.25@2252.6,5657.32 ; R47.1@2109.94,5647.91 cw(c2119.02,5638.83) 2119.02,5651.67 cw(c2119.02,5664.51) R47.1@2109.94,5655.43 ; R47.1@2112.77,5645.08 cw(c2128.68,5629.17) 2128.68,5651.67 cw(c2128.68,5674.16) R47.1@2112.77,5658.26 ; v1@2208.47,5644.95 ccw(c2192.26,5628.73) 2192.26,5651.67 ccw(c2192.26,5674.6) v1@2208.47,5658.38 ; v1@2211.3,5647.78 ccw(c2201.91,5638.39) 2201.91,5651.67 ccw(c2201.91,5664.94) v1@2211.3,5655.56 ; v1@2216.25,5650.61 cw(c2232.47,5634.39) 2232.47,5657.32 ; v1@2219.08,5647.78 cw(c2242.12,5624.73) 2242.12,5657.32 ; v1@2221.91,5644.95 cw(c2251.78,5615.08) U5.25@2251.78,5657.32 ; U5.25@2249.77,5654.49 ccw(c2242.94,5647.67) 2242.94,5657.32 ccw(c2242.94,5666.98) U5.25@2249.77,5660.15
ETH.E_MDIO: R46.1 U5.26 U8.D3 | length 4233.6
  Top Layer w4: v1@4741.81,4609.99 cw(c4725.59,4593.77) 4748.52,4593.77 cw(c4771.46,4593.77) v1@4755.24,4609.99 ; v1@4744.64,4612.82 cw(c4735.25,4603.43) 4748.52,4603.43 cw(c4761.8,4603.43) v1@4752.41,4612.82 ; v1(4748.52,4616.71) 4748.52,4593.37 ; 4851.26,4587.88 4854.73,4587.88 ; 4748.52,4593.37 4750.19,4591.71 ; 4748.52,4593.37 4750.19,4591.71 ; 4750.19,4591.71 4754.02,4587.88 4854.73,4587.88 ; 4854.73,4587.88 4855.26,4587.88 4860,4587.88 ; 4854.73,4587.88 4860,4587.88 ; 4860,4587.88 4870,4587.88 4873.88,4587.88 4936.73,4587.88 ; 4936.73,4587.88 cw(c4936.73,4549.2) 4964.08,4576.55 ; 4936.73,4587.88 cw(c4936.73,4549.2) 4964.08,4576.55 ; 4964.08,4576.55 ccw(c4976.61,4589.08) 4976.61,4571.36 cw(c4976.61,4589.08) 4964.08,4576.55 ; 4964.08,4576.55 cw(c4951.55,4564.02) 4969.27,4564.02 ccw(c4951.55,4564.02) 4964.08,4576.55
  MidLayer1 w4: v1@2233.47,5709.99 cw(c2217.26,5693.77) 2240.19,5693.77 cw(c2263.13,5693.77) v1@2246.91,5709.99 ; v1@2236.3,5712.82 cw(c2226.91,5703.43) 2240.19,5703.43 cw(c2253.47,5703.43) v1@2244.08,5712.82 ; v1(2240.19,5716.71) 2240.19,5641.71 2248.52,5633.37 ; 3666.31,5630 4037.94,5258.37 4340.19,5258.37 4640.19,4958.37 4640.19,4808.37 4690.19,4758.37 4690.19,4695 4690.19,4683.37 4690.19,4675.04 4722.39,4642.84 v1(4748.52,4616.71) v1@4748.52,4625.04 ; 3679.28,5617.03 3664.31,5632 2624.37,5632 2517.08,5524.71 2308.17,5524.71 2290.19,5542.69 2290.19,5591.71 ; v1@4739.02,4616.71 ccw(c4716.09,4616.71) 4732.31,4632.93 ccw(c4748.52,4649.14) v1@4748.52,4626.21 ; v1@4743.02,4616.71 ccw(c4729.75,4616.71) 4739.14,4626.1 ccw(c4748.52,4635.49) v1@4748.52,4622.21 ; 2248.52,5633.37 2286.02,5595.87 ; 2248.52,5633.37 2286.02,5595.87 ; 2286.02,5595.87 2290.19,5591.71 ; 2286.02,5595.87 2290.19,5591.71
  Bottom Layer w4: R46.1@2106.18,5705 2165,5705 2176.71,5716.71 v1(2240.19,5716.71) 2258.29,5716.71 ; R46.1@2109.94,5701.24 cw(c2119.02,5692.16) 2119.02,5705 cw(c2119.02,5717.84) R46.1@2109.94,5708.76 ; R46.1@2112.77,5698.41 cw(c2128.68,5682.5) 2128.68,5705 cw(c2128.68,5727.5) R46.1@2112.77,5711.59 ; v1@2233.47,5709.99 ccw(c2217.26,5693.77) 2217.26,5716.71 ccw(c2217.26,5739.64) v1@2233.47,5723.43 ; v1@2236.3,5712.82 ccw(c2226.91,5703.43) 2226.91,5716.71 ccw(c2226.91,5729.99) v1@2236.3,5720.6 ; v1@2248.01,5711.31 cw(c2258.29,5704.21) 2258.29,5716.71 ; v1@2248.01,5722.1 ccw(c2258.29,5729.2) 2258.29,5716.71 ; U5.26@2269.45,5683.68 ccw(c2262.63,5690.51) 2272.28,5690.51 ccw(c2281.94,5690.51) U5.26@2275.11,5683.68 ; U5.26@2272.28,5657.32 2272.28,5702.72 2258.29,5716.71
ETH.E_RESETB_E: R59.1 U5.42 U8.E4 | length 4785.1
  Top Layer w4: v3(4996.3,4544.33) U8.E4@5015.98,4524.65 ; U8.E4@5008.48,4524.65 ccw(c4990.38,4524.65) 5003.18,4537.45 ccw(c5015.98,4550.25) U8.E4@5015.98,4532.15 ; U8.E4@5008.64,4524.65 ccw(c4990.92,4524.65) 5003.45,4537.18 ccw(c5015.98,4549.71) U8.E4@5015.98,4531.99 ; 5009.1,4531.53 cw(c5021.91,4544.33) 5003.8,4544.33 ccw(c5021.91,4544.33) 5009.1,4531.53 ; 5009.1,4531.53 ccw(c4996.3,4518.72) 4996.3,4536.83 cw(c4996.3,4518.72) 5009.1,4531.53
  MidLayer1 w4: v4(2640,5540) 2740,5540 2745,5545 v4(2800,5545) ; v4@2644.11,5535.89 cw(c2654.03,5525.97) 2654.03,5540 cw(c2654.03,5554.03) v4@2644.11,5544.11 ; v4@2646.94,5533.06 cw(c2663.69,5516.31) 2663.69,5540 cw(c2663.69,5563.69) v4@2646.94,5546.94 ; v4@2793.06,5538.06 ccw(c2776.31,5521.31) 2776.31,5545 ccw(c2776.31,5568.69) v4@2793.06,5551.94 ; v4@2795.89,5540.89 ccw(c2785.97,5530.97) 2785.97,5545 ccw(c2785.97,5559.03) v4@2795.89,5549.11 ; v1(3965.19,5750.04) 4040.19,5750.04 4199.18,5591.05 4233.23,5557 4488.31,5557 4498.31,5567 4575.37,5567 4606.86,5535.52 4606.86,5033.37 4698.52,4941.71 4698.52,4696.48 4850.67,4544.33 4860,4544.33 4870,4544.33 4918.62,4544.33 v3(4996.3,4544.33) ; v1@3969.08,5746.15 cw(c3978.47,5736.76) 3978.47,5750.04 cw(c3978.47,5763.32) v1@3969.08,5753.93 ; v1@3971.91,5743.32 cw(c3988.13,5727.11) 3988.13,5750.04 cw(c3988.13,5772.98) v1@3971.91,5756.76 ; v3@4991.11,4539.14 ccw(c4978.57,4526.6) 4978.57,4544.33 ccw(c4978.57,4562.06) v3@4991.11,4549.52 ; 4978.19,4544.33 cw(c4978.19,4526.22) 4991,4539.03 ccw(c4978.19,4526.22) 4978.19,4544.33 ; 4978.19,4544.33 ccw(c4978.19,4562.44) 4991,4549.63 cw(c4978.19,4562.44) 4978.19,4544.33
  Bottom Layer w4: U5.42@2540.19,5500.04 2542.15,5502 2577,5502 2615,5540 v4(2640,5540) ; U5.42@2554.54,5497.01 cw(c2566.58,5484.98) 2566.58,5502 ; R59.1@2613.82,5322.5 2632.14,5340.82 2632.14,5391.99 2647.96,5407.81 2732.38,5407.81 2733.81,5406.37 2796.52,5406.37 2815.19,5425.04 2815.19,5508.12 2800,5523.31 ; R59.1@2613.82,5328.31 ccw(c2613.82,5342.34) R59.1@2623.74,5332.42 ; R59.1@2613.82,5332.31 ccw(c2613.82,5356) 2630.57,5339.25 ; R59.1@2619.14,5322.99 cw(c2630.79,5322.99) R59.1@2622.55,5331.23 ; R59.1@2623.14,5322.99 cw(c2644.45,5322.99) 2629.38,5338.06 ; v4@2633.06,5533.06 ccw(c2616.31,5516.31) 2616.31,5540 ccw(c2616.31,5563.69) v4@2633.06,5546.94 ; v4@2635.89,5535.89 ccw(c2625.97,5525.97) 2625.97,5540 ccw(c2625.97,5554.03) v4@2635.89,5544.11 ; v4@2793.06,5551.94 ccw(c2776.31,5568.69) 2800,5568.69 ccw(c2823.69,5568.69) v4@2806.94,5551.94 ; v4@2793.52,5537.63 cw(c2780.94,5523.31) 2800,5523.31 ; v4@2795.89,5549.11 ccw(c2785.97,5559.03) 2800,5559.03 ccw(c2814.03,5559.03) v4@2804.11,5549.11 ; v4@2796.16,5540.64 cw(c2788.71,5532.16) 2800,5532.16 cw(c2811.29,5532.16) v4@2803.84,5540.64 ; v4@2806.48,5537.63 ccw(c2819.06,5523.31) 2800,5523.31 ; v1@3958.47,5743.32 ccw(c3942.26,5727.11) 3942.26,5750.04 ccw(c3942.26,5772.98) v1@3958.47,5756.76 ; v1@3961.3,5746.15 ccw(c3951.91,5736.76) 3951.91,5750.04 ccw(c3951.91,5763.32) v1@3961.3,5753.93 ; v1(3965.19,5750.04) 3748.52,5750.04 3588.67,5909.89 3563.22,5935.34 3149.34,5935.34 3149,5935 3141.82,5935 3117.24,5910.43 2851,5644.19 2800,5593.18 v4(2800,5545) 2800,5523.31
ETH.E_RXC: U5.16 U8.B14 | length 4786.3
  Top Layer w4: v1(4102.86,5020.71) 4227.86,5020.71 v1(4265.19,4983.37) ; v1@4106.75,5016.82 cw(c4116.14,5007.43) 4116.14,5020.71 cw(c4116.14,5033.99) v1@4106.75,5024.6 ; v1@4109.57,5013.99 cw(c4125.79,4997.77) 4125.79,5020.71 cw(c4125.79,5043.64) v1@4109.57,5027.43 ; v1@4255.69,4983.37 ccw(c4232.76,4983.37) 4248.97,4999.59 ccw(c4265.19,5015.81) v1@4265.19,4992.87 ; v1@4259.69,4983.37 ccw(c4246.41,4983.37) 4255.8,4992.76 ccw(c4265.19,5002.15) v1@4265.19,4988.87 ; v1@5398.28,4833.28 cw(c5390.46,4825.46) 5401.52,4825.46 ; 5401.52,4808.67 cw(c5436.33,4808.67) v1@5411.72,4833.28 ; 5401.52,4818.33 cw(c5426.67,4818.33) v1@5408.89,4836.11 ; 5401.52,4827.99 cw(c5417.01,4827.99) v1@5406.06,4838.94 ; v1@5401.52,4830.37 5401.52,4750.71 5414.02,4738.21 5421.79,4738.21 5425.19,4734.81 5425.19,4720 5425.19,4710 5425.19,4662.47 cw(c5415.04,4662.47) 5422.22,4655.29 ; U8.B14@5409.69,4650.1 ccw(c5409.69,4667.83) 5422.22,4655.29 ; U8.B14@5417.03,4642.76 cw(c5434.75,4642.76) 5422.22,4655.29
  Bottom Layer w4: U5.16@2193.54,5440.79 2232.19,5440.79 2240.19,5432.79 2240.19,5340.19 2230.81,5330.81 2055.81,5330.81 2040.19,5315.19 2040.19,5061.36 2093.51,5008.04 3782,5008.04 3824,5050.04 4073.52,5050.04 v1(4102.86,5020.71) ; U5.16@2219.9,5437.96 cw(c2226.73,5431.13) 2226.73,5440.79 cw(c2226.73,5450.45) U5.16@2219.9,5443.62 ; v1@4093.36,5020.71 ccw(c4070.42,5020.71) 4086.64,5036.93 ccw(c4102.86,5053.14) v1@4102.86,5030.21 ; v1@4097.36,5020.71 ccw(c4084.08,5020.71) 4093.47,5030.1 ccw(c4102.86,5039.49) v1@4102.86,5026.21 ; v1(4265.19,4983.37) 4311.67,4983.37 4320,4991.71 4951.52,4991.71 4952.73,4990.5 4978.69,4964.54 5040.96,4964.54 5072.63,4932.87 5107.36,4932.87 5165.72,4991.23 5334.67,4991.23 5373.52,4952.37 5373.52,4871.48 v1(5405,4840) ; v1@4269.08,4979.49 cw(c4278.47,4970.1) 4278.47,4983.37 cw(c4278.47,4996.65) v1@4269.08,4987.26 ; v1@4271.91,4976.66 cw(c4288.13,4960.44) 4288.13,4983.37 cw(c4288.13,5006.31) v1@4271.91,4990.09 ; v1@5395.5,4840 ccw(c5372.56,4840) 5388.78,4856.22 ccw(c5405,4872.43) v1@5405,4849.5 ; v1@5399.5,4840 ccw(c5386.22,4840) 5395.61,4849.39 ccw(c5405,4858.78) v1@5405,4845.5
ETH.E_RXD0: U5.21 U8.C1 | length 4454
  Top Layer w4: v1@4740.19,4707.21 cw(c4740.19,4684.27) 4756.41,4700.49 cw(c4772.63,4716.71) v1@4749.69,4716.71 ; v1@4740.19,4711.21 cw(c4740.19,4697.93) 4749.58,4707.32 cw(c4758.97,4716.71) v1@4745.69,4716.71 ; v1(4740.19,4716.71) 4775.1,4681.79 4775.1,4613.9 4785.61,4603.39 4855.26,4603.39 4860,4603.39 4870,4603.39 U8.C1@4897.87,4603.39 ; U8.C1@4892.57,4598.08 ccw(c4879.77,4585.28) 4879.77,4603.39 ccw(c4879.77,4621.49) U8.C1@4892.57,4608.69 ; U8.C1@4892.68,4598.19 ccw(c4880.15,4585.66) 4880.15,4603.39 ccw(c4880.15,4621.11) U8.C1@4892.68,4608.58
  MidLayer1 w4: v1(4415.52,5741.37) 4462.54,5741.37 4631.86,5572.06 4631.86,5141.71 4739.94,5033.63 ; v1@4419.41,5737.49 cw(c4428.8,5728.1) 4428.8,5741.37 cw(c4428.8,5754.65) v1@4419.41,5745.26 ; v1@4422.24,5734.66 cw(c4438.46,5718.44) 4438.46,5741.37 cw(c4438.46,5764.31) v1@4422.24,5748.09 ; 4740,5033.69 4767,5006.69 4767,4743.52 v1(4740.19,4716.71) ; v1@4740.19,4722.21 ccw(c4740.19,4735.49) 4749.58,4726.1 ccw(c4758.97,4716.71) v1@4745.69,4716.71 ; v1@4740.19,4726.21 ccw(c4740.19,4749.14) 4756.41,4732.93 ccw(c4772.63,4716.71) v1@4749.69,4716.71
  MidLayer2 w4: v1@2133.47,5574.76 ccw(c2117.26,5590.98) 2140.19,5590.98 ccw(c2163.13,5590.98) v1@2146.91,5574.76 ; v1@2136.3,5571.93 ccw(c2126.91,5581.32) 2140.19,5581.32 ccw(c2153.47,5581.32) v1@2144.08,5571.93 ; v1(2140.19,5568.04) 2140.19,5759.19 2179,5798 2687,5798 2700,5785 2740,5785 2755,5800 4356.9,5800 4398.24,5758.66 v1(4415.52,5741.37) ; v1@4406.02,5741.37 ccw(c4383.09,5741.37) 4399.31,5757.59 ccw(c4415.52,5773.81) v1@4415.52,5750.87 ; v1@4410.02,5741.37 ccw(c4396.75,5741.37) 4406.14,5750.76 ccw(c4415.52,5760.15) v1@4415.52,5746.87
  Bottom Layer w4: v1@2133.96,5560.87 cw(c2122.11,5547.21) 2140.19,5547.21 ; v1@2136.58,5563.89 cw(c2129.72,5555.98) 2140.19,5555.98 cw(c2150.66,5555.98) v1@2143.8,5563.89 ; v1(2140.19,5568.04) 2140.19,5547.21 ; v1@2146.42,5560.87 ccw(c2158.27,5547.21) 2140.19,5547.21 ; U5.21@2167.19,5536.38 ccw(c2160.36,5529.56) 2160.36,5539.21 ccw(c2160.36,5548.87) U5.21@2167.19,5542.04 ; U5.21@2193.54,5539.21 2148.19,5539.21 2140.19,5547.21
ETH.E_RXD1: U5.20 U8.D2 | length 4065.9
  Top Layer w4: v1@4371.52,5584.21 cw(c4371.52,5561.27) 4387.74,5577.49 cw(c4403.96,5593.71) v1@4381.02,5593.71 ; v1@4371.52,5588.21 cw(c4371.52,5574.93) 4380.91,5584.32 cw(c4390.3,5593.71) v1@4377.02,5593.71 ; v1(4371.52,5593.71) 4443.93,5521.3 4455.23,5510 4599.27,5510 4623.52,5485.75 4623.52,5103.52 4610,5090 4610,5075 4623.84,5061.16 4623.84,4927.39 4685.31,4865.92 ; 4706.86,4844.37 4685.31,4865.92 ; 4685.31,4865.92 4714.86,4836.37 4714.86,4594.36 4729.69,4579.52 4860,4579.52 4870,4579.52 4917.53,4579.52 ; 4917.53,4579.52 cw(c4917.53,4569.37) 4924.71,4576.55 ; 4917.53,4579.52 cw(c4917.53,4569.37) 4924.71,4576.55 ; 4924.71,4576.55 cw(c4912.17,4564.02) 4929.9,4564.02 ccw(c4912.17,4564.02) 4924.71,4576.55 ; 4924.71,4576.55 ccw(c4937.24,4589.08) 4937.24,4571.36 cw(c4937.24,4589.08) 4924.71,4576.55
  MidLayer2 w4: v1(2147.86,5516.71) 2307.52,5516.71 2357.52,5566.71 2444.81,5566.71 2462.62,5548.9 2477.38,5548.9 2495.19,5566.71 3463.29,5566.71 3470,5560 3495,5560 3543.37,5608.37 4356.86,5608.37 v1(4371.52,5593.71) ; v1@2151.75,5512.82 cw(c2161.14,5503.43) 2161.14,5516.71 cw(c2161.14,5529.99) v1@2151.75,5520.6 ; v1@2154.57,5509.99 cw(c2170.79,5493.77) 2170.79,5516.71 cw(c2170.79,5539.64) v1@2154.57,5523.43
  Bottom Layer w4: v1(2147.86,5516.71) 2150.68,5519.53 U5.20@2193.54,5519.53 ; v1@2151.75,5512.82 cw(c2167.94,5496.62) U5.20@2167.94,5519.53 ; v1@2154.57,5509.99 cw(c2177.6,5486.96) U5.20@2177.6,5519.53 ; v1@2154.57,5523.43 ccw(c2163.98,5532.83) 2163.98,5519.53 ; U5.20@2167.19,5516.7 ccw(c2160.36,5509.87) 2160.36,5519.53 ccw(c2160.36,5529.18) U5.20@2167.19,5522.36
ETH.E_RXD2: U5.19 U8.D1 | length 3727.8
  Top Layer w4: v1@4665.19,4800.54 cw(c4665.19,4777.61) 4681.41,4793.82 cw(c4697.63,4810.04) v1@4674.69,4810.04 ; v1@4665.19,4804.54 cw(c4665.19,4791.26) 4674.58,4800.65 cw(c4683.97,4810.04) v1@4670.69,4810.04 ; v1(4665.19,4810.04) 4706.86,4768.37 4706.86,4591.04 4726.52,4571.37 4834.84,4571.37 4842.2,4564.02 4852,4564.02 4855.26,4564.02 4860,4564.02 4870,4564.02 U8.D1@4897.87,4564.02 ; U8.D1@4892.57,4558.71 ccw(c4879.77,4545.91) 4879.77,4564.02 ccw(c4879.77,4582.12) U8.D1@4892.57,4569.32 ; U8.D1@4892.68,4558.82 ccw(c4880.15,4546.29) 4880.15,4564.02 ccw(c4880.15,4581.74) U8.D1@4892.68,4569.21
  MidLayer1 w4: v1@2315.19,5548.87 cw(c2315.19,5525.94) 2331.41,5542.16 cw(c2347.63,5558.37) v1@2324.69,5558.37 ; v1@2315.19,5552.87 cw(c2315.19,5539.6) 2324.58,5548.99 cw(c2333.97,5558.37) v1@2320.69,5558.37 ; v1(2315.19,5558.37) 2340.86,5532.71 2513.77,5532.71 2621.06,5640 3667.63,5640 4040.92,5266.71 4348.52,5266.71 4665.19,4950.04 v1(4665.19,4810.04) ; v1@4658.47,4816.76 ccw(c4642.26,4832.98) 4665.19,4832.98 ccw(c4688.13,4832.98) v1@4671.91,4816.76 ; v1@4661.3,4813.93 ccw(c4651.91,4823.32) 4665.19,4823.32 ccw(c4678.47,4823.32) v1@4669.08,4813.93
  Bottom Layer w4: U5.19@2193.54,5499.84 2279.84,5499.84 2315.19,5535.19 v1(2315.19,5558.37) ; U5.19@2219.9,5497.01 cw(c2226.73,5490.19) 2226.73,5499.84 cw(c2226.73,5509.5) U5.19@2219.9,5502.67 ; v1@2308.47,5551.66 cw(c2292.26,5535.44) 2315.19,5535.44 cw(c2338.13,5535.44) v1@2321.91,5551.66 ; v1@2311.3,5554.49 cw(c2301.91,5545.1) 2315.19,5545.1 cw(c2328.47,5545.1) v1@2319.08,5554.49
ETH.E_RXD3: U5.18 U8.G5 | length 3861.3
  Top Layer w4: v3(5035.67,4465.59) U8.G5@5055.35,4445.91 ; U8.G5@5047.85,4445.91 ccw(c5029.75,4445.91) 5042.55,4458.71 ccw(c5055.35,4471.51) U8.G5@5055.35,4453.41 ; U8.G5@5048.01,4445.91 ccw(c5030.29,4445.91) 5042.82,4458.44 ccw(c5055.35,4470.97) U8.G5@5055.35,4453.25 ; 5048.47,4452.79 ccw(c5035.67,4439.98) 5035.67,4458.09 cw(c5035.67,4439.98) 5048.47,4452.79 ; 5048.47,4452.79 cw(c5061.28,4465.59) 5043.17,4465.59 ccw(c5061.28,4465.59) 5048.47,4452.79
  MidLayer1 w4: v1@2383.28,5443.28 cw(c2367.06,5427.06) 2390,5427.06 cw(c2412.93,5427.06) v1@2396.72,5443.28 ; v1@2386.11,5446.11 cw(c2376.72,5436.72) 2390,5436.72 cw(c2403.28,5436.72) v1@2393.89,5446.11 ; v1(2390,5450) 2390,5325 2398.29,5316.71 3595.52,5316.71 3795.02,5117.21 4424.11,5117.21 4483.86,5057.46 4483.86,5002.04 4481.86,5000.04 4481.86,4658.37 4490.19,4650.04 4531.86,4650.04 4565.19,4616.71 4645.54,4616.71 4687.21,4575.04 4711.19,4575.04 4799.38,4486.85 4805.13,4481.1 4860,4481.1 4870,4481.1 4918.62,4481.1 5012.16,4481.1 cw(c5012.16,4467.05) 5022.09,4476.99 ; v3@5028.2,4464.94 ccw(c5010.16,4463.36) 5021.8,4477.23 ccw(c5033.44,4491.1) v3@5035.02,4473.06
  Bottom Layer w4: U5.18@2193.54,5480.16 2248.03,5480.16 2259.58,5491.71 2348.29,5491.71 v1(2390,5450) ; U5.18@2219.9,5477.33 cw(c2226.73,5470.5) 2226.73,5480.16 cw(c2226.73,5489.81) U5.18@2219.9,5482.99 ; v1@2380.5,5450 ccw(c2357.56,5450) 2373.78,5466.22 ccw(c2390,5482.43) v1@2390,5459.5 ; v1@2384.5,5450 ccw(c2371.22,5450) 2380.61,5459.39 ccw(c2390,5468.78) v1@2390,5455.5
ETH.E_RXDV: U5.22 U8.C2 | length 4057
  Top Layer w4: v1(4807.86,4626.04) 4815,4618.89 4860,4618.89 ; 4856.86,4618.89 4855.26,4618.89 4860,4618.89 ; 4860,4618.89 4870,4618.89 4917.53,4618.89 ; 4917.53,4618.89 cw(c4917.53,4608.74) 4924.71,4615.92 ; 4917.53,4618.89 cw(c4917.53,4608.74) 4924.71,4615.92 ; 4924.71,4615.92 cw(c4912.17,4603.39) 4929.9,4603.39 ccw(c4912.17,4603.39) 4924.71,4615.92 ; 4924.71,4615.92 ccw(c4937.24,4628.45) 4937.24,4610.73 cw(c4937.24,4628.45) 4924.71,4615.92
  MidLayer1 w4: v1@2445,5598.9 v1(2445,5595) 2498,5648 3829.82,5648 3981.86,5800.04 4415.19,5800.04 4640.19,5575.04 4640.19,5144.81 4775,5010 4775,4658.9 v1(4807.86,4626.04) v1@4805.86,4626.04 ; v1@2445,5600.5 ccw(c2445,5613.78) 2454.39,5604.39 ccw(c2463.78,5595) v1@2450.5,5595 ; v1@2445,5604.5 ccw(c2445,5627.43) 2461.22,5611.22 ccw(c2477.43,5595) v1@2454.5,5595 ; v1@4798.36,4626.04 ccw(c4775.42,4626.04) 4791.64,4642.26 ccw(c4807.86,4658.48) v1@4807.86,4635.54 ; v1@4802.36,4626.04 ccw(c4789.08,4626.04) 4798.47,4635.43 ccw(c4807.86,4644.82) v1@4807.86,4631.54
  Bottom Layer w4: U5.22@2193.54,5558.37 2290.19,5558.37 2313.52,5581.71 2360.79,5581.71 2375.79,5566.71 2416.71,5566.71 v1(2445,5595) v1@2445,5598.9 ; U5.22@2219.9,5556.07 cw(c2225.47,5550.5) 2225.47,5558.37 ; U5.22@2219.9,5561.73 ccw(c2227.99,5569.82) 2227.99,5558.37 ; v1@2435.5,5595 cw(c2412.56,5595) 2428.78,5578.78 cw(c2445,5562.56) v1@2445,5585.5 ; v1@2439.5,5595 cw(c2426.22,5595) 2435.61,5585.61 cw(c2445,5576.22) v1@2445,5589.5
ETH.E_RXER: U6.14 U8.A7 | length 2792.6
  Top Layer w4: v1@5076.47,4951.66 cw(c5060.26,4935.44) 5083.19,4935.44 cw(c5106.13,4935.44) v1@5089.91,4951.66 ; v1@5079.3,4954.49 cw(c5069.91,4945.1) 5083.19,4945.1 cw(c5096.47,4945.1) v1@5087.08,4954.49 ; v1(5083.19,4958.37) 5083.19,4918.04 5123.52,4877.71 5123.52,4867.98 5134.09,4857.41 5134.09,4724.74 5134.09,4720 5134.09,4710 U8.A7@5134.09,4682.13 ; U8.A7@5128.79,4687.43 ccw(c5115.99,4700.23) 5134.09,4700.23 ccw(c5152.2,4700.23) U8.A7@5139.4,4687.43 ; 5134.09,4699.85 cw(c5116.37,4699.85) 5128.9,4687.32 ccw(c5116.37,4699.85) 5134.09,4699.85 ; 5134.09,4699.85 ccw(c5151.82,4699.85) 5139.29,4687.32 cw(c5151.82,4699.85) 5134.09,4699.85
  Bottom Layer w4: U6.14@3341.06,5546.61 3483.39,5546.61 3550.61,5479.39 3550.61,5461.09 3556.72,5454.98 3728.47,5454.98 3740.19,5466.71 3931.86,5466.71 3956.86,5441.71 4006.86,5441.71 4023.86,5458.71 4322.85,5458.71 4331.52,5450.04 4581.86,5450.04 4673.52,5541.71 4723.52,5541.71 4973.52,5291.71 4973.52,4992.79 4985.77,4980.54 5061.02,4980.54 v1(5083.19,4958.37) ; U6.14@3379.38,5541.76 cw(c3391.08,5530.06) 3391.08,5546.61 cw(c3391.09,5563.17) U6.14@3379.38,5551.46 ; v1@5073.69,4958.37 ccw(c5050.76,4958.37) 5066.97,4974.59 ccw(c5083.19,4990.81) v1@5083.19,4967.87 ; v1@5077.69,4958.37 ccw(c5064.41,4958.37) 5073.8,4967.76 ccw(c5083.19,4977.15) v1@5083.19,4963.87
ETH.E_TXC: U5.7 U8.H4 | length 4647.4
  Top Layer w4: v3(4996.3,4426.22) U8.H4@5015.98,4406.54 ; U8.H4@5008.48,4406.54 ccw(c4990.38,4406.54) 5003.18,4419.34 ccw(c5015.98,4432.14) U8.H4@5015.98,4414.04 ; U8.H4@5008.64,4406.54 ccw(c4990.92,4406.54) 5003.45,4419.07 ccw(c5015.98,4431.6) U8.H4@5015.98,4413.88 ; 5009.1,4413.42 cw(c5021.91,4426.22) 5003.8,4426.22 ccw(c5021.91,4426.22) 5009.1,4413.42 ; 5009.1,4413.42 ccw(c4996.3,4400.61) 4996.3,4418.72 cw(c4996.3,4400.61) 5009.1,4413.42
  MidLayer1 w4: v1(1815.19,5066.71) 1840.19,5091.71 1873.52,5091.71 1890.19,5075.04 1890.69,5074.54 3453.19,5074.54 3488.65,5110 3549.88,5110 3576.5,5083.37 4013.13,5083.37 4173.69,4922.81 4173.69,4908.46 4257.61,4824.54 4259.73,4824.54 4340,4744.27 4340,4718.13 4518.13,4540 4608.56,4540 4715.19,4433.37 4779.22,4433.37 4786.37,4426.22 4799.29,4426.22 4860,4426.22 4870,4426.22 4918.62,4426.22 v3(4996.3,4426.22) ; v1@1815.19,5072.21 ccw(c1815.19,5085.49) 1824.58,5076.1 ccw(c1833.97,5066.71) v1@1820.69,5066.71 ; v1@1815.19,5076.21 ccw(c1815.19,5099.14) 1831.41,5082.93 ccw(c1847.63,5066.71) v1@1824.69,5066.71 ; v3@4991,4420.92 ccw(c4978.19,4408.11) 4978.19,4426.22 ccw(c4978.19,4444.33) v3@4991,4431.52 ; v3@4991.11,4421.03 ccw(c4978.57,4408.49) 4978.57,4426.22 ccw(c4978.57,4443.95) v3@4991.11,4431.41
  MidLayer2 w4: v1@1808.47,5073.43 ccw(c1792.26,5089.64) 1815.19,5089.64 ccw(c1838.13,5089.64) v1@1821.91,5073.43 ; v1@1811.3,5070.6 ccw(c1801.91,5079.99) 1815.19,5079.99 ccw(c1828.47,5079.99) v1@1819.08,5070.6 ; v1(1815.19,5066.71) 1815.19,5200.04 1831.86,5216.71 1915.19,5216.71 1973.52,5275.04 1976.29,5277.81 2348.75,5277.81 v1(2351.52,5275.04) ; 2321.9,5277.81 cw(c2321.9,5245.42) v1@2344.81,5268.32 ; 2331.56,5277.81 cw(c2331.56,5255.07) v1@2347.64,5271.15 ; 2335.28,5277.81 ccw(c2335.28,5291.29) v1@2344.81,5281.76
  Bottom Layer w4: U5.7@2348.59,5295.98 cw(c2344.81,5291.04) 2351.02,5291.04 ; U5.7@2351.02,5322.68 2351.02,5291.04 ; v1(2351.52,5275.04) 2351.52,5290.54 2351.02,5291.04 ; U5.7@2353.46,5295.98 ccw(c2357.24,5291.04) 2351.02,5291.04
ETH.E_TXD0: R45.1 U5.6 U8.F4 | length 4496.3
  Top Layer w4: v3(4996.3,4504.96) U8.F4@5015.98,4485.28 ; U8.F4@5008.48,4485.28 ccw(c4990.38,4485.28) 5003.18,4498.08 ccw(c5015.98,4510.88) U8.F4@5015.98,4492.78 ; U8.F4@5008.64,4485.28 ccw(c4990.92,4485.28) 5003.45,4497.81 ccw(c5015.98,4510.34) U8.F4@5015.98,4492.62 ; 5009.1,4492.16 cw(c5021.91,4504.96) 5003.8,4504.96 ccw(c5021.91,4504.96) 5009.1,4492.16 ; 5009.1,4492.16 ccw(c4996.3,4479.35) 4996.3,4497.46 cw(c4996.3,4479.35) 5009.1,4492.16
  MidLayer1 w4: v1(2140.19,5208.37) 2173.52,5241.71 2231.86,5241.71 2290.19,5183.37 2348.52,5183.37 2373.52,5208.37 2373.52,5426.48 2365,5435 2365,5475 2375,5485 2405,5485 2420,5470 2420,5445 2450,5415 2780,5415 2860.72,5334.28 3600.6,5334.28 3801.67,5133.21 4435.02,5133.21 4615.19,4953.04 4615.19,4726.37 4706.86,4634.71 4706.86,4606.04 4801.8,4511.1 4807.94,4504.96 4860,4504.96 4870,4504.96 4918.62,4504.96 v3(4996.3,4504.96) ; v1@2140.19,5213.87 ccw(c2140.19,5227.15) 2149.58,5217.76 ccw(c2158.97,5208.37) v1@2145.69,5208.37 ; v1@2140.19,5217.87 ccw(c2140.19,5240.81) 2156.41,5224.59 ccw(c2172.63,5208.37) v1@2149.69,5208.37 ; v3@4991.11,4499.77 ccw(c4978.57,4487.23) 4978.57,4504.96 ccw(c4978.57,4522.69) v3@4991.11,4510.15 ; 4978.19,4504.96 cw(c4978.19,4486.85) 4991,4499.66 ccw(c4978.19,4486.85) 4978.19,4504.96 ; 4978.19,4504.96 ccw(c4978.19,4523.07) 4991,4510.26 cw(c4978.19,4523.07) 4978.19,4504.96
  Bottom Layer w4: v1(2140.19,5208.37) R45.1@2170,5208.37 ; v1@2141.71,5208.37 cw(c2141.71,5178.39) R45.1@2162.92,5199.59 ; v1@2144.08,5204.49 cw(c2153.47,5195.1) 2153.47,5208.37 cw(c2153.47,5221.65) v1@2144.08,5212.26 ; v1@2146.91,5201.66 cw(c2163.13,5185.44) 2163.13,5208.37 cw(c2163.13,5231.31) v1@2146.91,5215.09 ; v1@2151.37,5208.37 cw(c2151.37,5188.04) R45.1@2165.75,5202.42 ; 2152.31,5208.37 ccw(c2152.31,5223.38) R45.1@2162.92,5212.77 ; R45.1@2166.51,5214.82 ccw(c2164.41,5220) 2170,5220 ccw(c2175.59,5220) R45.1@2173.49,5214.82 ; R45.1@2170,5206.18 2170,5220 2180,5230 2245,5230 2249.19,5234.19 2307.38,5234.19 2322.9,5249.71 2353.71,5249.71 2370.71,5266.71 U5.6@2370.71,5322.68 ; U5.6@2367.88,5296.32 cw(c2361.05,5289.49) 2370.71,5289.49 cw(c2380.36,5289.49) U5.6@2373.54,5296.32
ETH.E_TXD1: R44.1 U5.5 U8.E1 | length 3975.6
  Top Layer w4: v1@4459.03,5009.48 cw(c4447.64,4996.12) 4465.19,4996.12 ; v1@4461.62,5012.52 cw(c4455.03,5004.79) 4465.19,5004.79 cw(c4475.35,5004.79) v1@4468.76,5012.52 ; v1(4465.19,5016.71) 4465.19,4996.12 ; v1@4471.35,5009.48 ccw(c4482.74,4996.12) 4465.19,4996.12 ; U8.E1@4892.57,4519.34 ccw(c4879.77,4506.54) 4879.77,4524.65 ccw(c4879.77,4542.75) U8.E1@4892.57,4529.95 ; U8.E1@4892.68,4519.45 ccw(c4880.15,4506.92) 4880.15,4524.65 ccw(c4880.15,4542.37) U8.E1@4892.68,4529.84 ; U8.E1@4897.87,4524.65 4870,4524.65 4860,4524.65 4842.13,4524.65 4835.19,4517.71 4781.01,4517.71 4778.01,4520.71 4703.83,4520.71 4698.83,4515.71 4673.52,4515.71 4665.19,4524.04 4665.19,4566.71 4648.52,4583.37 4648.52,4722.06 4556.86,4813.73 4556.86,4904.46 4465.19,4996.12
  MidLayer1 w4: v1@2198.52,5198.87 cw(c2198.52,5175.94) 2214.74,5192.16 cw(c2230.96,5208.37) v1@2208.02,5208.37 ; v1@2198.52,5202.87 cw(c2198.52,5189.6) 2207.91,5198.99 cw(c2217.3,5208.37) v1@2204.02,5208.37 ; v1(2198.52,5208.37) 2231.86,5175.04 2373.52,5175.04 2506.86,5308.37 3141.63,5308.37 ; 3141.29,5308.71 3141.63,5308.37 ; v1@4458.47,5023.43 ccw(c4442.26,5039.64) 4465.19,5039.64 ccw(c4488.13,5039.64) v1@4471.91,5023.43 ; v1@4461.3,5020.6 ccw(c4451.91,5029.99) 4465.19,5029.99 ccw(c4478.47,5029.99) v1@4469.08,5020.6 ; v1(4465.19,5016.71) 4465.19,5064.81 4420.79,5109.21 3791.71,5109.21 3592.54,5308.37 3141.63,5308.37
  Bottom Layer w4: v1(2198.52,5208.37) 2233.81,5208.37 R44.1@2236,5206.18 ; v1@2202.41,5204.49 cw(c2211.8,5195.1) 2211.8,5208.37 cw(c2211.8,5221.65) v1@2202.41,5212.26 ; v1@2205.24,5201.66 cw(c2221.46,5185.44) 2221.46,5208.37 cw(c2221.46,5231.31) v1@2205.24,5215.09 ; v1@2207.71,5208.37 cw(c2207.71,5178.39) R44.1@2228.92,5199.59 ; 2217.37,5208.37 cw(c2217.37,5188.04) R44.1@2231.75,5202.42 ; 2218.31,5208.37 ccw(c2218.31,5223.38) R44.1@2228.92,5212.77 ; R44.1@2236,5208.37 R44.1@2236,5206.18 ; R44.1@2236.49,5211.5 ccw(c2236.49,5223.15) R44.1@2244.73,5214.91 ; R44.1@2236.49,5215.5 ccw(c2236.49,5236.81) 2251.56,5221.74 ; R44.1@2241.81,5206.18 cw(c2255.84,5206.18) R44.1@2245.92,5216.1 ; R44.1@2245.81,5206.18 cw(c2269.5,5206.18) 2252.75,5222.93 ; U5.5@2387.57,5296.32 cw(c2380.74,5289.49) 2390.39,5289.49 cw(c2400.05,5289.49) U5.5@2393.22,5296.32 ; U5.5@2390.39,5322.68 2390.39,5267.1 2365,5241.71 2326.21,5241.71 2310.69,5226.19 2256.01,5226.19 R44.1@2236,5206.18